# Altium PCB RF-IR-Blaster-v1.1.PcbDoc (part 2 of 3)
Units mil, origin at the board's own origin, x right, y up, seen from the top; angles counter-clockwise.
Board outline 2559.06 x 2401.57 mil, 2 copper layers (Top Layer, Bottom Layer), stack 62.205 mil thick; 68 components, 37 nets, 870 pads, 147 vias.
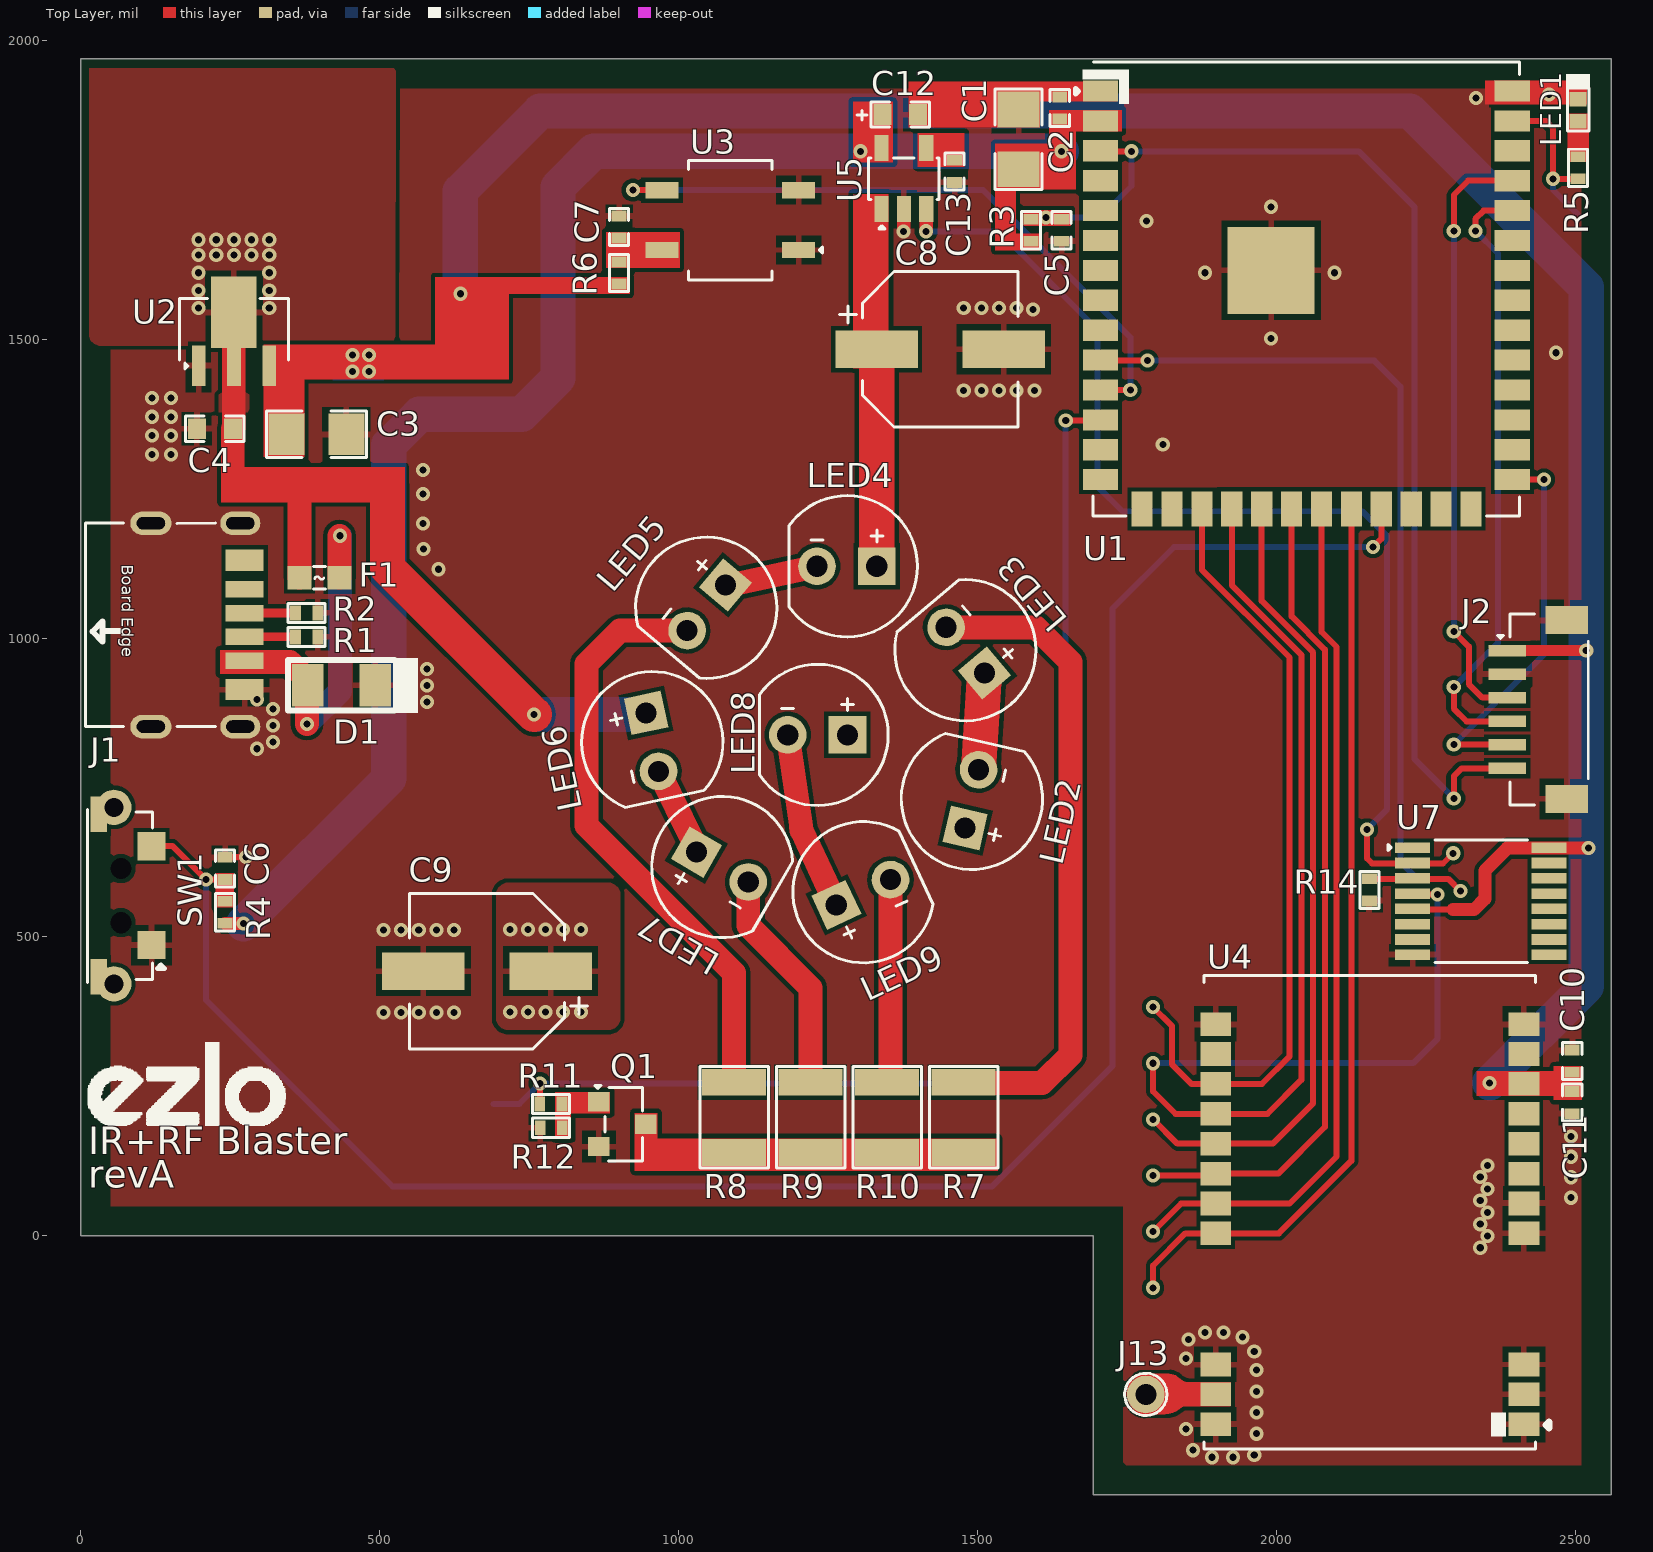
[diagram p0: Top Layer view]

## Free pads (board coordinates) (continued)
  rect 0x7.28 on Mech1: 1(895.76,1594.76) 1(895.76,1594.76) 1(895.76,1594.76) 1(895.76,1634.92) 1(895.76,1634.92) 1(1585.72,1662.08) 1(1585.72,1662.08) 1(1585.72,1662.08) 1(1585.72,1702.24) 1(1585.72,1702.24) 1(2501.08,1771.93) 1(2501.08,1771.93) 1(2501.08,1771.93) 1(2501.08,1812.08) 1(2501.08,1812.08)
  round 70.87 on Mech1: 1(938.89,883.3) 1(938.89,883.3) 1(1020.14,642.22) 1(1020.14,642.22) 1(1076.71,1097.14) 1(1076.71,1097.14) 1(1082.77,1701.85) 1(1082.77,1701.85) 1(1082.77,1701.85) 1(1082.77,1801.85) 1(1082.77,1801.85) 1(1259.29,555.44) 1(1259.29,555.44) 1(1281.19,847.12) 1(1281.19,847.12) 1(1329.82,1122.71) 1(1329.82,1122.71) 1(1476.24,688.3) 1(1476.24,688.3) 1(1507.63,940.77) 1(1507.63,940.77)
  rect 0x70.87 on Mech1: 1(961.13,785.81) 1(1014.36,1018.96) 1(1110.24,598.83) 1(1349.39,598.82) 1(1445.28,1018.95) 1(1498.5,785.79)
  rect 47.24x31.5 on Mech1: 1(964.66,1653.42) 1(964.66,1653.42) 1(964.66,1753.42) 1(964.66,1753.42) 1(964.66,1753.42) 1(1200.88,1653.42) 1(1200.88,1653.42) 1(1200.88,1753.42) 1(1200.88,1753.42) 1(1200.88,1753.42)
  rect 0x25.58 on Mech1: 1(1082.77,1601.85)
  rect 0x42.32 on Mech1: 1(1093.6,139.94) 1(1093.6,139.94) 1(1093.6,139.94) 1(1093.6,255.1) 1(1093.6,255.1) 1(1221.55,139.94) 1(1221.55,139.94) 1(1221.55,139.94) 1(1221.55,255.1) 1(1221.55,255.1) 1(1349.5,139.94) 1(1349.5,139.94) 1(1349.5,139.94) 1(1349.5,255.1) 1(1349.5,255.1) 1(1477.45,139.94) 1(1477.45,139.94) 1(1477.45,139.94) 1(1477.45,255.1) 1(1477.45,255.1)
  rect 70.87x70.87 on Mech1: 1(1181.19,847.12) 1(1229.82,1122.71)
  rect 59.06x35.43 on Mech1: 1(1703.83,1249.09) 1(1703.83,1299.09) 1(1703.83,1299.09) 1(1703.83,1299.09) 1(1703.83,1349.09) 1(1703.83,1349.09) 1(1703.83,1349.09) 1(1703.83,1399.09) 1(1703.83,1399.09) 1(1703.83,1399.09) 1(1703.83,1449.09) 1(1703.83,1449.09) 1(1703.83,1449.09) 1(1703.83,1499.09) 1(1703.83,1499.09) 1(1703.83,1499.09) 1(1703.83,1549.09) 1(1703.83,1549.09) 1(1703.83,1549.09) 1(1703.83,1599.09) 1(1703.83,1599.09) 1(1703.83,1599.09) 1(1703.83,1649.09) 1(1703.83,1649.09) 1(1703.83,1649.09) 1(1703.83,1699.09) 1(1703.83,1699.09) 1(1703.83,1699.09) 1(1703.83,1749.09) 1(1703.83,1749.09) 1(1703.83,1749.09) 1(1703.83,1799.09) 1(1703.83,1799.09) 1(1703.83,1799.09) 1(1703.83,1849.09) 1(1703.83,1849.09) 1(1703.83,1849.09) 1(1703.83,1899.09) 1(1703.83,1899.09) 1(1703.83,1899.09) 1(2392.81,1249.09) 1(2392.81,1249.09) 1(2392.81,1249.09) 1(2392.81,1299.09) 1(2392.81,1299.09) 1(2392.81,1299.09) 1(2392.81,1349.09) 1(2392.81,1349.09) 1(2392.81,1349.09) 1(2392.81,1399.09) 1(2392.81,1399.09) 1(2392.81,1399.09) 1(2392.81,1449.09) 1(2392.81,1449.09) 1(2392.81,1449.09) 1(2392.81,1499.09) 1(2392.81,1499.09) 1(2392.81,1499.09) 1(2392.81,1549.09) 1(2392.81,1549.09) 1(2392.81,1549.09) 1(2392.81,1599.09) 1(2392.81,1599.09) 1(2392.81,1599.09) 1(2392.81,1649.09) 1(2392.81,1649.09) 1(2392.81,1649.09) 1(2392.81,1699.09) 1(2392.81,1699.09) 1(2392.81,1699.09) 1(2392.81,1749.09) 1(2392.81,1749.09) 1(2392.81,1749.09) 1(2392.81,1799.09) 1(2392.81,1799.09) 1(2392.81,1799.09) 1(2392.81,1849.09) 1(2392.81,1849.09) 1(2392.81,1849.09) 1(2392.81,1899.09)
  rect 35.43x59.06 on Mech1: 1(1773.32,1199.88) 1(1773.32,1199.88) 1(1773.32,1199.88) 1(1823.32,1199.88) 1(1823.32,1199.88) 1(1823.32,1199.88) 1(1873.32,1199.88) 1(1873.32,1199.88) 1(1873.32,1199.88) 1(1923.32,1199.88) 1(1923.32,1199.88) 1(1923.32,1199.88) 1(1973.32,1199.88) 1(1973.32,1199.88) 1(1973.32,1199.88) 1(2023.32,1199.88) 1(2023.32,1199.88) 1(2023.32,1199.88) 1(2073.32,1199.88) 1(2073.32,1199.88) 1(2073.32,1199.88) 1(2123.32,1199.88) 1(2123.32,1199.88) 1(2123.32,1199.88) 1(2173.32,1199.88) 1(2173.32,1199.88) 1(2173.32,1199.88) 1(2223.32,1199.88) 1(2223.32,1199.88) 1(2223.32,1199.88) 1(2273.32,1199.88) 1(2273.32,1199.88) 1(2273.32,1199.88) 1(2323.32,1199.88)
  rect 0x25.98 on Mech1: 1(1890.84,-333.98) 1(1890.84,-333.98) 1(1890.84,-283.98) 1(1890.84,-283.98) 1(1890.84,-283.98) 1(1890.84,-233.98) 1(1890.84,-233.98) 1(1890.84,-233.98) 1(1890.84,20.35) 1(1890.84,20.35) 1(1890.84,20.35) 1(1890.84,70.35) 1(1890.84,70.35) 1(1890.84,70.35) 1(1890.84,120.35) 1(1890.84,120.35) 1(1890.84,120.35) 1(1890.84,170.35) 1(1890.84,170.35) 1(1890.84,170.35) 1(1890.84,220.35) 1(1890.84,220.35) 1(1890.84,220.35) 1(1890.84,270.35) 1(1890.84,270.35) 1(1890.84,270.35) 1(1890.84,320.35) 1(1890.84,320.35) 1(1890.84,320.35) 1(1890.84,370.35) 1(1890.84,370.35) 1(1890.84,370.35) 1(2422.34,-333.98) 1(2422.34,-333.98) 1(2422.34,-283.98) 1(2422.34,-283.98) 1(2422.34,-233.98) 1(2422.34,-233.98) 1(2422.34,24.68) 1(2422.34,24.68) 1(2422.34,74.68) 1(2422.34,74.68) 1(2422.34,74.68) 1(2422.34,124.68) 1(2422.34,124.68) 1(2422.34,124.68) 1(2422.34,174.68) 1(2422.34,174.68) 1(2422.34,174.68) 1(2422.34,224.68) 1(2422.34,224.68) 1(2422.34,224.68) 1(2422.34,274.68) 1(2422.34,274.68) 1(2422.34,274.68) 1(2422.34,324.68) 1(2422.34,324.68) 1(2422.34,324.68) 1(2422.34,374.68) 1(2422.34,374.68)
  rect 35.43x35.43 on Mech1: 1(1934.15,1540.04) 1(1934.15,1595.15) 1(1934.15,1650.27) 1(1989.27,1540.04) 1(1989.27,1595.15) 1(1989.27,1650.27) 1(2044.38,1540.04) 1(2044.38,1540.04) 1(2044.38,1595.15) 1(2044.38,1650.27)

## Via types
v1: diameter 23.62, hole 11.81, Top Layer to Bottom Layer, tented both sides, 145 vias
v2: diameter 23.62, hole 11.81, Top Layer to Bottom Layer, 2 vias